# Altium PCB PCB1.PcbDoc (part 2 of 3)
Units mm, origin at the board's own origin, x right, y up, seen from the top; angles counter-clockwise.
Board outline 100 x 48 mm, 4 copper layers (Top Layer, Top GND, Bottom VM, Bottom Layer), stack 1.513 mm thick; 171 components, 136 nets, 609 pads, 571 vias.
Unrouted connection lines stored in the file: 44.
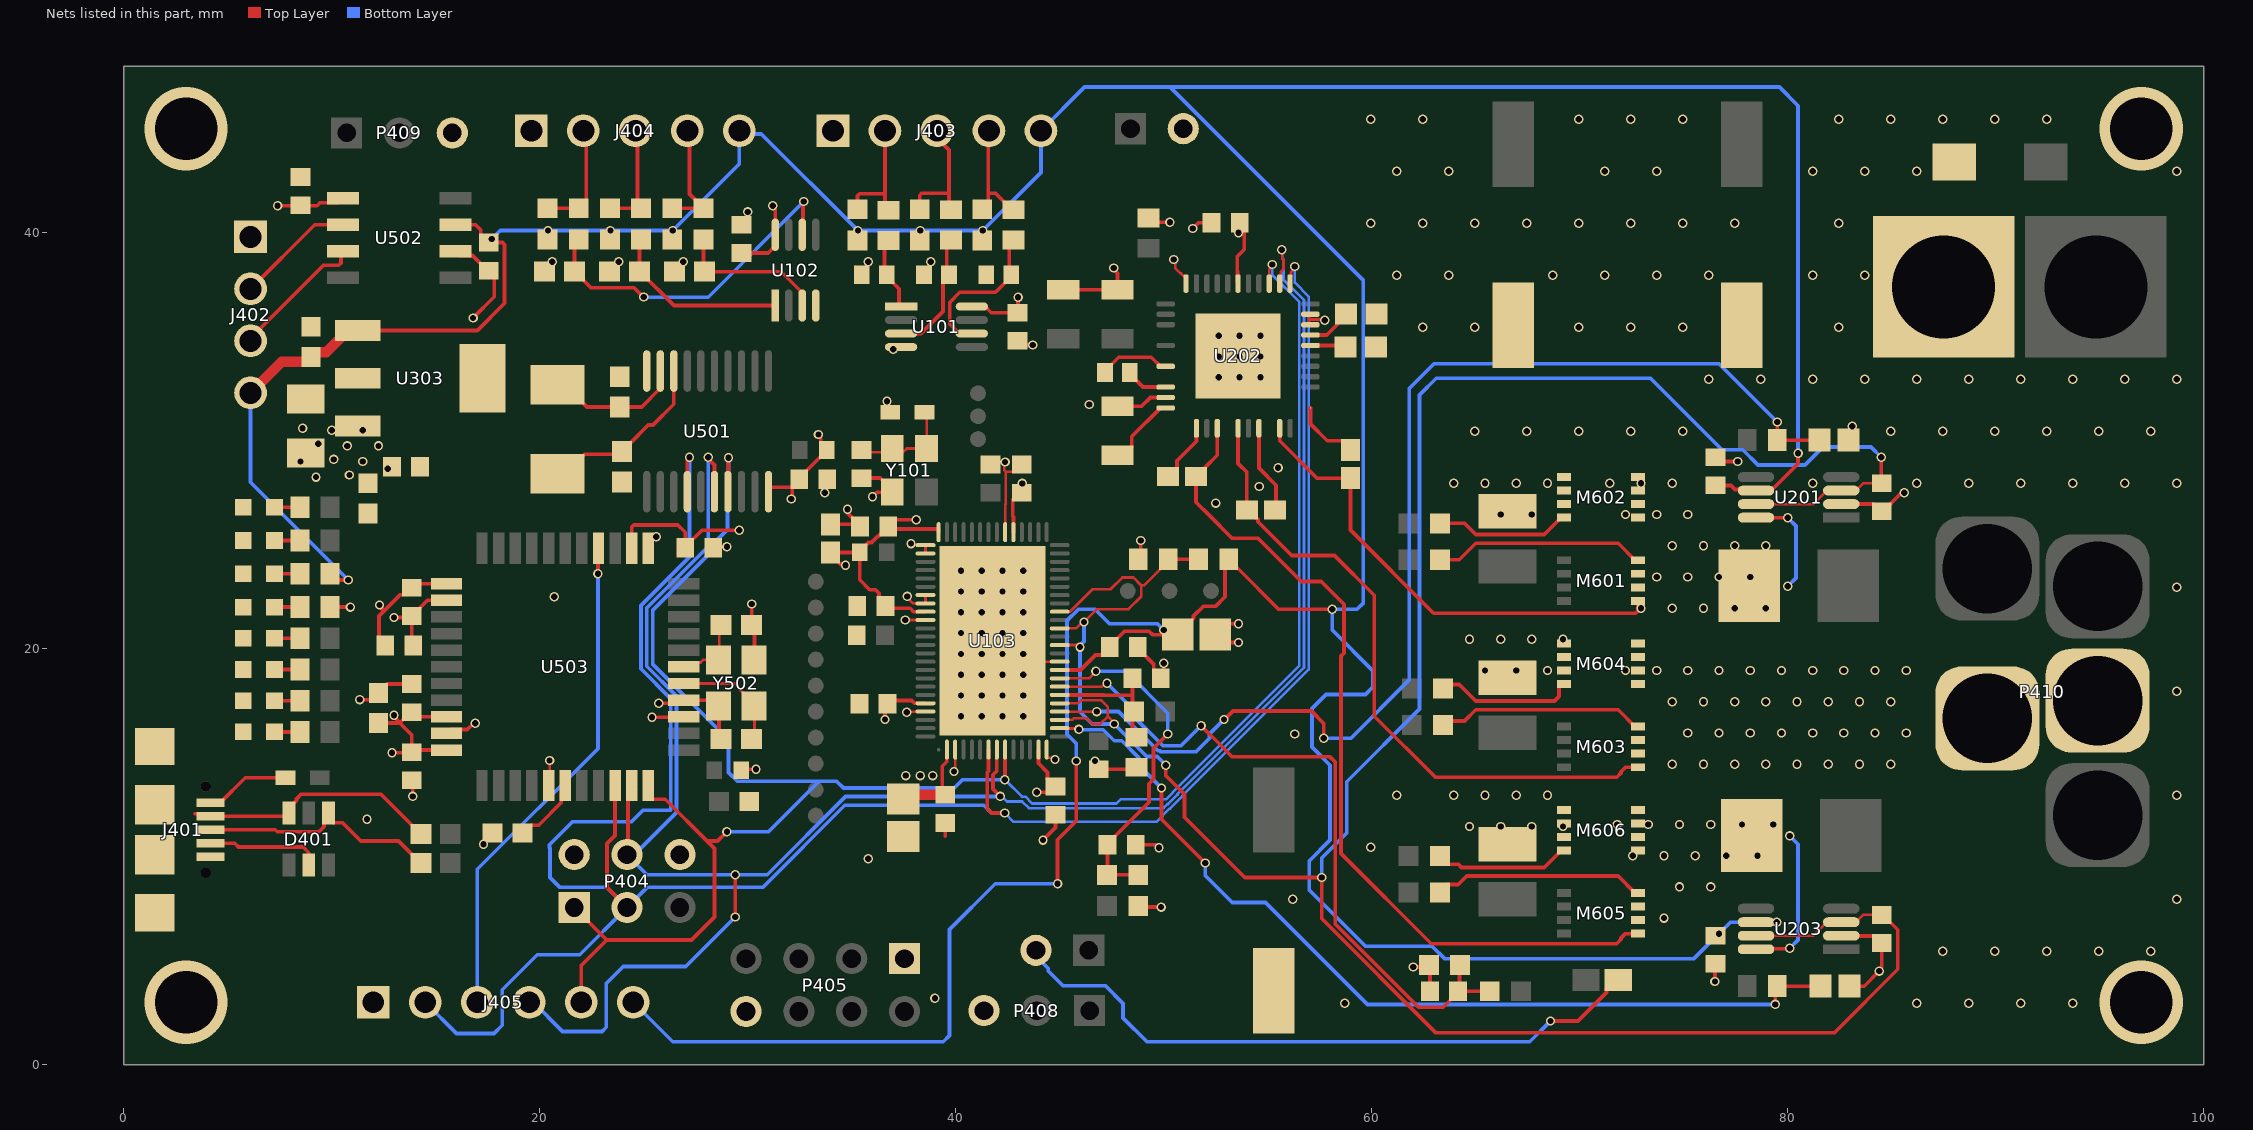
[diagram p4: the nets of this part, all layers, seen from the top]

## Part data (continued)
R101 R102 R103 R104 R105 R106 R109 R111 R112 R301 R302 R308 R309: library part CMP-1012-00586-3, "Precision Thick Film Chip Resistor, 4.7 KOhm, +/- 1%, -55 to 155 degC, 0603 (1608 Metric), RoHS, Tape and Reel", Case Code (Imperial)=1206, Case Code (Metric)=3216, Case\Package=1205, Max Operating Temperature="125 degC", Min Operating Temperature="-55 degC", Package Quantity=1, Power Rating="250 mW", Resistance="220 Ohm", Tolerance=5%, Type (Resistor)="Thick Film", Voltage Rating="50 V", ComponentLink1Description="Manufacturer URL", ComponentLink1URL=http://www.panasonic.com/, ComponentLink2Description=Datasheet, ComponentLink2URL=http://industrial.panasonic.com/cdbs/www-data/pdf/RDA0000/AOA0000C86.pdf, DatasheetVersion=Apr-15, Elements=4, Height="0.024 inch", Length="0.126 inch", Mount="Surface Mount", PackageDescription="2-Pin Surface Mount Device, Body 1.6 x 0.85 mm", PackageReference=0603, Packaging="Tape and Reel", Pins=8, Radiation Hardening=No, REACH SVHC="No SVHC", RoHSCompliant=true, Width="0.063 inch"
R107 R108 R110 R201 R202 R203 R303 R305 R306 R310 R311 R505 R506 R507 R508 R509 R510: library part CMP-2000-00180-1, Manufacturer=Panasonic, Part Number=ERJ-3EKF1001V
R113 R501 R504: library part CMP-1012-00623-3, "Chip Resistor, 10 KOhm, +/- 1%, 0.1 W, -55 to 155 degC, 0603 (1608 Metric), RoHS, Tape and Reel", Case Code (Imperial)=0603, Case Code (Metric)=1608, Manufacturer=Panasonic, Max Operating Temperature=155degC, Max Power Dissipation=100mW, Min Operating Temperature=-55degC, Package Description="2-Pin Surface Mount Device, Body 1.6 x 0.85 mm", Package Quantity=1, Package Reference=603, Resistance=10KOhm, Temperature Coefficient=100ppm\/degreesC, Tolerance=1%, Voltage Rating=75V, Case\/Package=0603, Composition=ThickFilm, Contact Plating=Tin, Datasheet URL=https://industrial.panasonic.com/cdbs/www-data/pdf/RDA0000/AOA0000C304.pdf, Datasheet Version=02/2017, Depth=0.8mm, Height=0.45mm, Lead Free=LeadFree, Length=1.6mm, Manufacturer URL=http://www.panasonic.com/, Military Standard=Not, Mount=SurfaceMount, Mounting Technology=SurfaceMount, Number of Pins=2, Number of Terminations=2, Packaging=TapeandReel, Power Rating=100mW, Radiation Hardening=No, REACH SVHC=NoSVHC, RoHSCompliant=true, Termination=SMD/SMT, Voltage Rating (DC)=75V, Width=0.031inch
R304: library part CMP-2000-00523-2, "Chip Resistor, 47 KOhm, +/- 1%, 0.1 W, -55 to 155 degC, 0603 (1608 Metric), RoHS, Tape and Reel", Case Code (Imperial)=0603, Case Code (Metric)=1608, Colour=Red, Forward Current="20 mA", Forward Voltage="2.1 V", Max Operating Temperature="100 degC", Min Operating Temperature="-40 degC", Package Quantity=3000, Power Rating="90 mW", Case\Package=0603, ComponentLink1Description="Manufacturer URL", ComponentLink1URL=http://www.panasonic.com/, ComponentLink2Description=Datasheet, ComponentLink2URL=http://industrial.panasonic.com/cdbs/www-data/pdf/RDA0000/AOA0000C86.pdf, DatasheetVersion=Apr-15, Height="0.6 mm", Illumination Colour=Red, Length="1.6 mm", Lens Style=Clear, Luminous Intensity="63 mcd", Mount="Surface Mount", Nominal Vf="2.1 V", Nominal Wavelength="639 nm", PackageDescription="2-Pin Surface Mount Device, Body 1.6 x 0.85 mm", PackageReference=0603, Packaging="Tape and Reel", Pins=2, Radiation Hardening=No, REACH SVHC="No SVHC", RoHSCompliant=true, Viewing Angle="160 degrees", Width="0.8 mm"
R307: library part CMP-2000-05271-3, "NTC Thermistor for Temperature Sensor, 0603, 10kΩ, 1%, 0.1mA, 5V", Case Code (Imperial)=0603, Case Code (Metric)=1608, Current Rating=310uA, Manufacturer Series=NCP18, Max Operating Temperature=125°C, Max Power Dissipation=100mW, Min Operating Temperature=-40°C, Package Quantity=1, Package Shape=Rectangular, Resistance=10kR, Resistance Tolerance=1%, Accuracy=0.7%, Case/Package=0603, Depth=0.8mm, Height=0.8mm, Lead Free="Lead Free", Length=1.6mm, Mount="Surface Mount", Number of Pins=2, Number of Terminals/Pins=2, Packaging="Tape and Reel", Power Rating=100mW, Radiation Hardening=No, REACH SVHC="No SVHC", RoHS Compliant=Yes, Series=NCP, Terminal Finish=Tin, Terminal Placement=Dual, Termination=SMD/SMT, Thermistor Application="TEMPERATURE COMPENSATION", Tolerance=1%
R502 R503: library part CMP-26527-001634-1, "22Ω ±5% 0.1W 0603 Thick Film Chip Resistor AEC-Q200 compliant", Case Code (Imperial)=0603, Case Code (Metric)=1608, Max Operating Temperature=155°C, Max Power Dissipation=100mW, Min Operating Temperature=-55°C, Resistor Type="Thick Film", Temperature Coefficient=100ppm/°C, Tolerance=5%, Case/Package=0603, Contact Plating=Tin, Features="Automotive AEC-Q200", Height=0.022inch, Lead Free="Lead Free", Length=0.061inch, Mount="Surface Mount", Number of Terminations=2, Packaging="Tape and Reel", Power Rating=100mW, Radiation Hardening=No, Resistance=22R, RoHS Compliant=Yes, Series=RMCF, Size Code=0603, Width=0.031inch
R601 R602 R604 R605 R606 R607: library part CMP-2000-00195-2, "RES SMD 10 OHM 1% 1/10W 0603", Manufacturer=Panasonic, Manufacturer Part Number=ERJ-3EKF10R0V, Package=ERJ3EK, Power=100mW, Power Rating=0.1W, Resistance=10Ω, Temperature="-55°C to +155°C", Temperature Coefficient=100ppm/°C, Temperature Range High=+155°C, Temperature Range Low=-55°C, Tolerance=1%, Voltage Rating=75V, Automotive=Yes, Automotive Grade="Grade 0", Category=Res, ComponentLink2Description=Datasheet, ComponentLink2URL=https://b2b-api.panasonic.eu/file_stream/pids/fileversion/1263, Composition="Thick Film", Device Class L1="Passive Components", Device Class L2=Resistors, Device Class L3="Chip SMD Resistors", Digikey Description="RES SMD 10 OHM 1% 1/10W 0603", Footprint Url=https://industrial.panasonic.com/cdbs/www-data/pdf/RDA0000/DMA0000COL17.pdf, Height=0.55mm, Ipc Land Pattern Name=RESC16080X45, Lead Free=Yes, Octopart=https://octopart.com/erj-3ekf10r0v-panasonic-55403649, RoHS=TRUE, Series=ERJ
R603 R608: library part CMP-07231-007668-1, "RES 0.003 OHM 1% 3W 2512", Case Code (Imperial)=2512, Case Code (Metric)=6432, Max Operating Temperature=170°C, Max Power Dissipation=3W, Min Operating Temperature=-55°C, Resistance=3mR, Resistance Tolerance=1%, Resistor Type="Metal Alloy", Temperature Coefficient=75ppm/°C, Case/Package=2512, Contact Plating=Tin, Depth=3.35mm, Features="Moisture Resistant", Height=0.035inch, Length=0.254inch, Mount="Surface Mount", Number of Terminations=2, Packaging="Cut Tape", Power Rating=3W, REACH SVHC="No SVHC", RoHS Compliant=No, Series=CRE2512, Technology="METAL STRIP", Termination=Solder, Tolerance=1%, Width=0.132inch
U101 U102: library part CMP-0859-00525-5, "IC BUFFER NON-INVERT 5.5V SM8", Ambient Temperature Range High=+125°C, Ambient Temperature Range Low=-40°C, Manufacturer="Texas Instruments", Max Supply Voltage=5.5V, Min Supply Voltage=1.65V, Nominal Supply Current=10uA, Package=DCT0008A, Temperature="-40°C to +125°C", Automotive=No, Category=IC, ComponentLink2Description=Datasheet, ComponentLink2URL=http://www.ti.com/lit/ds/symlink/sn74lvc3g17.pdf, Device Class L1="Integrated Circuits (ICs)", Device Class L2="Logic ICs", Device Class L3=Buffers, Digikey Description="IC BUFFER NON-INVERT 5.5V SM8", Height=1.3mm, Ipc Land Pattern Name=SOP65P400X130-8, Lead Free=Yes, Logic Function Desc=Non-Inverting, Manufacturer Part Number=SN74LVC3G17DCTR, Mouser Description="Buffers & Line Drivers TRIPLE SCHMITT- TRIGGER BUFFER", Number Of Circuits=3, Number Of Inputs=3, Number Of Outputs=3, Octopart=https://octopart.com/sn74lvc3g17dctr-texas+instruments-423176, Propagation Delay=5.1ns, RoHS=TRUE, Standoff Height=0mm, Temperature Range High=+125°C, Temperature Range Low=-40°C
U103: library part CMP-237673-000008-1, "SERVO CONTROLLER IC, QFN76", Supplier Part Number 1=3438306, Supplier 1=Farnell
U201 U203: library part CMP-09116-000026-1, "IC CURR SENSE 1 CIRCUIT 8MSOP", Input Bias Current=130uA, Input Offset Voltage=0.2mV, Manufacturer="Analog Devices", Max Supply Voltage=5.5V, Min Supply Voltage=2.7V, Nominal Supply Current=2.6mA, Package=RM-8, Temperature="-40°C to +125°C", Temperature Range High=+125°C, Temperature Range Low=-40°C, Voltage Gain=0.02V/mV, Automotive=No, Bandwidth=250kHz, Category=IC, ComponentLink2Description=Datasheet, ComponentLink2URL=https://www.analog.com/media/en/technical-documentation/data-sheets/AD8418.pdf, Device Class L1="Integrated Circuits (ICs)", Device Class L2="Linear ICs", Device Class L3=Instrumentation, Digikey Description="IC CURR SENSE 1 CIRCUIT 8MSOP", Height=1.1mm, Ipc Land Pattern Name=SOP65P490X110-8, Lead Free=Yes, Manufacturer Part Number=AD8418BRMZ, Mouser Description="Current Sense Amplifier, Bidirectional, 1, 130 A, MSOP, 8, -40 C, 125 C", Number Of Channels=1, Octopart=https://octopart.com/ad8418brmz-analog+devices-21054230, RoHS=TRUE, Standoff Height=0.05mm
U202: "No Description Available", Mfr_Name=Trinamic, RefDes=RefDes, Type=Type
U303: library part CMP-0136-00481-1, "500mA Fixed Output CMOS LDO, 3-Pin SOT-223, Extended Temperature, Tape and Reel", DatasheetVersion="revB, 2002", PackageDescription="3-Lead Plastic Small Outline Transistor (DB) [SOT-223]", PackageReference=SOT-223-DB3, PackageVersion="revBB, Aug-2009"
U501: library part CMP-0186-00077-2, "Stand-Alone CAN Controller With SPI Interface, 20-Pin TSSOP, Industrial Temperature", Code_JEDEC=MO-153-AC, ComponentLink1Description="Manufacturer URL", ComponentLink1URL=http://www.microchip.com/, ComponentLink2Description=Datasheet, ComponentLink2URL=http://ww1.microchip.com/downloads/en/DeviceDoc/21801f.pdf, ComponentLink3Description="Package Specification", ComponentLink3URL=http://www.microchip.com/stellent/groups/techpub_sg/documents/packagingspec/en012702.pdf, DatasheetVersion="revF, Oct-2010", PackageDescription="20-Lead Plastic Thin Shrink Small Outline (ST) - 4.4mm Body [TSSOP]", PackageReference=TSSOP-ST20, PackageVersion="revBB, Aug-2009", RevisionNote="URLs added. DatasheetVersion updated."
U502: library part CMP-06279-000005-1, "IC TRANSCEIVER 1/1 8SOIC", Case/Package=SOIC, Max Operating Temperature=125°C, Max Supply Voltage=5.5V, Min Operating Temperature=-40°C, Min Supply Voltage=4.5V, Operating Supply Current=70mA, Package Quantity=3300, Data Rate=8Mbps, Mount="Surface Mount", Number of Pins=8, Number of Transceivers=1, Packaging="Tape and Reel", Receiver Hysteresis=200mV, Weight=0.019048oz
U503: library part CMP-06276-000452-1, "IC MCU 8BIT 32KB FLASH 44TQFP", Case/Package=TQFP, Frequency=16MHz, Max Operating Temperature=85°C, Max Supply Voltage=5.5V, Min Operating Temperature=-40°C, Min Supply Voltage=2.7V, Package Quantity=1500, Core Architecture=AVR, Data Bus Width=8b, Interface=I2C, Max Frequency=16MHz, Memory Size=32KB, Memory Type=FLASH, Mount="Surface Mount", Number of I/Os=26, Number of Pins=44, Number of Timers/Counters=4, Oscillator Type=Internal, Packaging="Tape and Reel", Peripherals="Brown-out Detect/Reset", RAM Size=2.5KB, Series="AVR® ATmega"
Y101: library part CMP-27762-000357-1, "XTAL Oscillator 25MHz ±25ppm CMOS 3.3V 4-SMD 3.2mm x 2.5mm", Case/Package=SMD/SMT, Frequency=25MHz, Frequency Stability=25ppm, Load Capacitance=15pF, Max Operating Temperature=85°C, Max Supply Current=13mA, Max Supply Voltage=3.465V, Min Operating Temperature=-40°C, Min Supply Voltage=3.135V, Operating Frequency="25 MHz", Operating Supply Voltage=3.3V, Package Quantity=1000, Height=0.047inch, Lead Free="Lead Free", Length=0.126inch, Mount="Surface Mount", Number of Pins=4, Packaging="Tape and Reel", REACH SVHC="No SVHC", Series=ASE, Termination=SMD/SMT, Width=0.098inch
Y501: library part CMP-2000-05034-2, "Crystal 8MHz ±20ppm 18pF SMD-2 6mm x 3.5mm", Case/Package=CSMD, ESR (Equivalent Series Resistance)=100R, Frequency Stability=30ppm, Frequency Tolerance=20ppm, Load Capacitance=18pF, Max Operating Temperature=85°C, Min Operating Temperature=-40°C, Operating Frequency="8 MHz", Package Quantity=1000, Resistor Type=Ceramic, Series Resistance=80R, Depth=3.5mm, Frequency=8MHz, Height=0.055inch, Lead Free="Lead Free", Length=6mm, Mount="Surface Mount", Number of Pins=2, Packaging="Tape and Reel", Radiation Hardening=No, REACH SVHC=Yes, Series=ABM7, Termination=SMD/SMT, Tolerance=20ppm, Width=0.138inch
Y502: library part CMP-27762-006537-2, "Crystal 16MHz ±20ppm (Tol) ±30ppm (Stability) 18pF FUND 80Ω 4-Pin SMD T/R", Case/Package=CSMD, ESR (Equivalent Series Resistance)=80R, Frequency Stability=30ppm, Frequency Tolerance=20ppm, Load Capacitance=18pF, Max Operating Temperature=85°C, Min Operating Temperature=-40°C, Operating Frequency="16 MHz", Package Quantity=1000, Depth=2.5mm, Frequency=16MHz, Height=1mm, Lead Free="Lead Free", Length=3.2mm, Mount="Surface Mount", Number of Pins=4, Packaging="Tape and Reel", Radiation Hardening=No, Series=ABM8G, Series Resistance=80R, Termination=SMD/SMT, Tolerance=20ppm, Width=2.5mm

## Via types
v1: diameter 0.45, hole 0.3, Top Layer to Bottom Layer, tented both sides, 488 vias
v2: diameter 0.45, hole 0.3, Top Layer to Bottom Layer, 77 vias
v3: diameter 4, hole 3, Top Layer to Bottom Layer, 4 vias
v4: diameter 0.8, hole 0.5, Top Layer to Bottom Layer, tented both sides, 2 vias

## Nets (pads, with @x,y where several pads share a name; then routed paths per layer and width w, separated by ;. In a path a pad name is that pad's centre, name@x,y a point inside that pad or via, vN(x,y) a via of type N, cw(c..) or ccw(c..) an arc to the next point about the centre after c; other vN are vias at no path point)
+2.5VREF: C201.1 C207.1 R310.1 R311.2 U103.17 U103.19 U103.26 U103.28 U103.30 U201.3 U201.7 U203.3 U203.7 | length 140.9
  Top Layer w0.127: U103.17@45.003,16.577 45.612,16.577 45.698,16.664 46.29,16.664 46.577,16.377 46.944,16.377 47.32,16.752 ; U103.19@45.003,17.377 45.888,17.377 46.03,17.52 47.002,17.52 47.32,17.202 47.32,16.752 ; U103.26@45.003,20.177 45.791,20.177 45.89,20.078 v1(45.977,20.078) ; U103.28@45.003,20.977 45.775,20.977 46.021,21.222 46.125,21.222 46.17,21.177 v1(46.17,21.284) 46.784,21.898 48.309,21.898 48.922,22.51 48.922,23.044 ; U103.30@45.003,21.777 45.015,21.79 45.508,21.79 46.577,22.858 47.447,22.858 48.01,23.421 48.544,23.421 48.922,23.044 ; v1(47.623,16.383) 47.623,16.449 47.32,16.752 ; R311.2@50.225,24.225 49.044,23.044 48.922,23.044 ; U203.7@78.477,6.202 81.229,6.202 81.879,6.852 U203.3@82.577,6.852 83.276,6.852 83.626,7.202 C207.1@84.527,7.202 ; U201.7@78.477,26.952 81.229,26.952 81.879,27.602 U201.3@82.577,27.602 83.276,27.602 83.626,27.952 C201.1@84.527,27.952
  Top Layer w0.18: v1(50.1,14.4) 50.1,13.905 51,13.005 51,11.9 53.9,9 v1(57.6,9) 57.6,7.023 63.092,1.531 82.236,1.531 85.292,4.587 85.292,6.487 84.577,7.202 C207.1@84.527,7.202 ; R311.2@50.225,24.225 50.3,24.3 R310.1@51.675,24.3 ; v1(84.5,29.2) 84.5,27.979 C201.1@84.527,27.952
  Bottom Layer w0.18: v1(46.17,21.284) 46.17,20.344 45.977,20.151 v1(45.977,20.078) 45.977,16.972 46.566,16.383 v1(47.623,16.383) 49.186,14.82 49.683,14.82 49.747,14.756 49.756,14.756 50.1,14.413 v1(50.1,14.4) ; v1(57.6,9) 57.6,9.943 58.8,11.143 58.8,13.6 62.3,17.1 62.3,32.2 63.1,33 73.404,33 76.835,29.569 77.836,29.569 78.574,28.831 80.825,28.831 81.694,29.7 84,29.7 v1(84.5,29.2)
+3.3: C108.1 C109.1 C307.2 C308.2 C309.2 C310.2 C311.2 C312.2 C313.2 C314.2 C315.2 C327.1 C329.2 C330.2 C506.1 C507.2 C508.2 C511.1 C512.2 C513.2 C514.2 C515.2 FB101.1 P403.2 P404.2 P405.1 R113.2 R201.2 R306.2 R307.2 R501.2 R504.2 U101.8 U102.8 U103.2 U103.13 U103.43 U103.52 U103.61 U103.72 U202.16 U303.3 U501.20 U502.5 U503.14 U503.24 U503.34 U503.42 U503.44 | length 104.5
  Top Layer w0.18: v1(7.4,41.3) 9.303,41.3 9.447,41.445 10.34,41.445 U502.5@10.55,41.655 ; C329.2@8.75,29.4 C329.2@8.75,29.75 ; R306.2@10,22 v1(10.9,22) ; U303.3@11.497,30.5 U303.3@11.5,30.503 ; C511.1@12.25,16.423 13.273,16.423 ; v1(12.3,22.1) 12.3,22.027 12.511,21.816 ; C506.1@12.575,20.15 12.273,20.452 12.273,21.578 13.211,22.515 13.285,22.59 13.465,22.59 14.002,23.127 U503.34@15.527,23.127 ; v1(12.7,28.65) 12.8,28.75 C330.2@12.9,28.75 ; v1(12.9,15) 13.825,15 C514.2@13.85,15.025 ; v1(13,16.8) 13,16.727 13.273,16.454 13.273,16.423 ; U503.44@15.527,15.127 13.952,15.127 C514.2@13.85,15.025 ; U503.42@15.527,16.727 14.073,16.727 C513.2@13.85,16.95 13.8,16.95 13.273,16.423 ; U503.24@24.427,24.827 24.427,25.847 24.532,25.952 26.643,25.952 27,25.595 C515.2@27,24.9 ; v1(25.4,16.7) 26.9,16.7 U503.14@26.927,16.727 ; C515.2@27,24.85 C515.2@27,24.9 ; v1(29.6,25.7) 27.8,25.7 C515.2@27,24.9 ; R504.2@29.7,14.15 29.75,14.2 v1(30.4,14.2) ; C109.1@29.7,39.025 30.986,39.025 31.325,39.364 U102.8@31.325,39.9 31.325,41.102 31.2,41.227 v1(31.2,41.3) ; U501.20@31,27.765 C507.2@32.14,27.765 ; v1(32.1,27.2) 32.14,27.24 C507.2@32.14,27.765 ; v1(33.4,30.3) 33.4,30.227 33.515,30.112 33.515,29.835 R501.2@33.8,29.55 33.8,29.5 33.515,29.215 33.49,29.215 32.475,28.2 C507.2@32.475,28.15 32.14,27.815 C507.2@32.14,27.765 ; v1(34.7,24.011) 34.659,24.052 34.48,24.052 33.977,24.554 C315.2@33.977,24.627 35.327,24.627 35.812,25.112 35.952,25.112 36.239,25.4 36.275,25.4 36.367,25.492 36.417,25.492 C311.2@36.675,25.75 ; R113.2@35.385,24.635 35.385,23.315 35.863,22.837 36.141,22.837 36.315,22.662 36.315,22.36 36.729,21.946 37.813,21.946 37.979,21.779 38.549,21.779 U103.61@38.551,21.777 ; v1(36.6,16.6) 36.6,17.225 C308.2@36.725,17.35 36.891,17.516 37.882,17.516 38.007,17.391 38.019,17.379 38.549,17.379 U103.72@38.551,17.377 ; v1(36.7,31.9) 36.7,31.529 FB101.1@36.852,31.377 ; v1(38.1,26.2) 37.075,26.2 C311.2@36.752,25.877 36.752,25.827 C311.2@36.675,25.75 ; U103.52@39.177,25.602 39.177,25.744 39.171,25.75 C311.2@36.675,25.75 ; C309.2@39.5,12.975 39.353,13.122 39.353,14.347 39.575,14.568 39.575,15.149 U103.2@39.577,15.151 ; U101.8@40.777,36.452 41.414,36.452 41.714,36.152 C108.1@42.977,36.152 43,36.175 v1(43,36.9) ; U103.43@42.777,25.602 42.777,26.329 42.743,26.362 42.743,27.168 C312.2@43.077,27.502 ; C312.2@43.177,27.502 43.177,27.925 v1(43.2,27.948) ; v1(43.9,13.1) 44.525,13.1 C307.2@44.8,13.375 44.75,13.375 44.415,13.71 44.415,14.055 43.979,14.491 43.979,15.149 U103.13@43.977,15.151 ; R201.2@49.277,40.702 49.479,40.5 v1(50.3,40.5) ; U202.16@53.577,37.557 53.543,37.591 53.543,38.133 53.535,38.141 53.535,38.856 53.877,39.199 53.877,40.252 C314.2@53.652,40.477 53.652,40.052 v1(53.6,40) ; v1(68.6,2.1) 69.916,2.1 71.29,3.474 71.29,3.638 71.729,4.077 R307.2@71.853,4.077 ; 13.273,16.423 13.85,15.846 C514.2@13.85,15.025
  Top Layer w0.5: C313.2@37.477,12.777 37.675,12.975 C309.2@39.5,12.975
  Bottom Layer w0.18: P403.2@43.86,5.5 43.86,5.227 44.445,4.642 44.445,4.515 45.16,3.8 47.2,3.8 48.05,2.95 48.05,2.25 49.2,1.1 67.6,1.1 v1(68.6,2.1)
  other v1: 37.6,13.9 38.3,13.9 38.9,13.9 9.25,28.25 10.852,28.352 8.5,29 11.5,29 10.1,29.1 10.75,29.75 12.25,29.75 9.352,29.852 10,30.5 11.5,30.5 8.602,30.602
+5: C211.1 C212.1 C304.2 C305.2 C321.1 C509.2 J402.4 J403.5 J404.5 J405.6 R101.2 R102.2 R103.2 R104.2 R105.2 R106.2 R305.2 R310.2 U103.23 U201.6 U203.6 U303.1 U502.3 | length 264.5
  Top Layer w0.18: R305.2@9.8,23.6 10.1,23.3 v1(10.8,23.3) ; R305.2@9.925,23.6 R305.2@9.925,23.675 ; U303.1@11.25,35.3 17.005,35.3 18.315,36.61 18.315,39.42 18.21,39.525 17.5,39.525 17.165,39.86 17.165,40.13 16.91,40.385 U502.3@15.95,40.385 ; R102.2@20.377,39.677 20.377,40.077 v1(20.4,40.1) ; R106.2@23.377,39.677 23.377,40.077 v1(23.4,40.1) ; R104.2@26.377,39.677 26.377,40.077 v1(26.4,40.1) ; R105.2@35.277,39.627 35.277,40.077 v1(35.3,40.1) ; R103.2@38.277,39.627 38.277,40.077 v1(38.3,40.1) ; R101.2@41.277,39.627 41.277,40.077 v1(41.3,40.1) ; v1(44.9,8.7) 44.9,10.815 45.8,11.715 v1(45.8,14.6) ; U103.23@45.003,18.977 46.001,18.977 46.716,19.692 47.067,19.692 47.402,20.027 47.402,20.127 48.117,20.842 49.297,20.842 49.462,20.677 C304.2@50.677,20.677 50.677,20.702 51.437,21.462 51.437,21.572 51.9,22.036 52.485,22.036 52.948,22.499 52.948,24.123 R310.2@53.125,24.3 53.125,24.225 53.485,23.865 53.56,23.865 55.525,21.9 v1(58.1,21.9) ; C211.1@76.527,27.852 77.272,27.852 77.465,27.659 78.42,27.659 U201.6@78.477,27.602 79.196,27.602 79.318,27.724 79.334,27.724 80.5,28.89 v1(80.5,29.4)
  Top Layer w0.5: J402.4@6.1,32.3 7.594,33.794 8.794,33.794 9,34 9,34.046 9.206,34.252 9.743,34.252 10.4,34.909 10.4,35.05 10.65,35.3 U303.1@11.25,35.3
  Bottom Layer w0.18: J402.4@6.1,32.3 6.1,28 v1(10.8,23.3) ; v1(17.7,39.7) 17.703,39.7 18.103,40.1 v1(23.4,40.1) v1(26.4,40.1) 29.6,43.3 J404.5@29.6,44.9 29.757,44.743 30.658,44.743 v1(35.3,40.1) v1(38.3,40.1) v1(41.3,40.1) 44.1,42.9 J403.5@44.1,44.9 46.2,47 50.308,47 ; J405.6@24.5,3 26.4,1.1 39.4,1.1 39.7,1.4 39.7,6.5 41.9,8.7 v1(44.9,8.7) ; v1(45.8,14.6) 45.8,15.439 45.354,15.885 45.354,21.354 45.9,21.9 46.7,21.9 47.4,21.2 49.7,21.2 v1(50,20.9) ; v1(79.48,6.852) 77.252,6.852 v1(76.7,6.3) 75.5,5.1 63.5,5.1 62.9,5.7 59.7,5.7 56.998,8.402 56.998,9.798 58,10.8 58,14.4 57.131,15.269 57.131,17.131 57.8,17.8 59.697,17.8 60.069,18.172 60.069,18.931 58.1,20.9 v1(58.1,21.9) 59.3,21.9 59.6,22.2 59.6,37.708 50.308,47 ; v1(80.5,29.4) 80.5,46.1 79.6,47 50.308,47
GND: *401.2 C101.2 C102.2 C103.2 C104.2 C105.2 C106.2 C107.2 C108.2 C109.2 C201.2 C202.1 C207.2 C208.2 C209.2 C210.1 C211.2 C212.2 C301.1 C302.1 C303.1 C304.1 C305.1 C307.1 C308.1 C309.1 C310.1 C311.1 C312.1 C313.1 C314.1 C315.1 C316.2 C317.1 C318.2 C319.1 C320.1 C321.2 C322.1 C323.1 C324.1 C327.2 C329.1 C330.1 C501.1 C502.2 C503.2 C504.2 C505.1 C506.2 C507.1 C508.1 C509.1 C510.2 C511.2 C512.1 C513.1 C514.1 C515.1 C601.2 C602.2 C603.2 D301.1 D302.1 D401.2 D402.1 D501.1 D502.1 DS501.2 DS502.2 DS503.2 DS504.2 J401.4 J401.5 J401.Shell J402.1 J403.1 J404.1 J405.1 M602.1 M602.2 M602.3 M604.1 M604.2 M604.3 M606.1 M606.2 M606.3 P404.6 P405.8 P406.2 P408.3 P409.3 R301.1 R303.1 R309.1 R311.1 U101.4 U102.4 U103.3 U103.14 U103.24 U103.44 U103.53 U103.54 U103.59 U103.60 U103.62 U103.73 U103.77 U201.2 U202.8 U202.9 U202.21 U202.38 U203.2 U303.2 U303.4 U501.10 U502.2 U503.5 U503.15 U503.23 U503.35 U503.43 Y101.2 Y502.2 Y502.4 | length 89.4
  Top Layer w0.127: U503.5@20.427,13.427 20.477,13.477 v1(20.477,14.627) ; v1(37.577,21.377) U103.62@38.551,21.377 ; v1(37.677,22.515) 37.677,22.441 37.941,22.177 U103.60@38.551,22.177 U103.59@38.551,22.577 ; v1@37.677,16.964 38.539,16.964 U103.73@38.551,16.977 ; v1(37.851,25.054) 37.939,25.054 38.003,24.99 38.16,24.99 38.172,24.977 U103.53@38.551,24.977 U103.54@38.551,24.577 ; v1(39.922,14.1) 39.977,14.155 U103.3@39.977,15.151 ; U103.77@41.777,20.377 42.777,19.377 U103.24@45.003,19.377 ; U103.44@42.377,25.602 42.377,26.929 42.416,26.968 42.416,28.503 ; v1(42.377,28.977) 42.341,28.941 42.341,28.577 42.416,28.503 ; C312.1@43.177,28.852 42.828,28.503 42.416,28.503 ; U103.14@44.377,15.151 44.377,14.785 44.407,14.755 44.612,14.755 44.69,14.677 v1(44.777,14.677) ; v1(50.487,38.713) 50.549,38.651 50.549,38.3 50.811,38.038 50.837,38.038 51.077,37.798 U202.21@51.077,37.557 ; U202.8@57.057,35.577 57.054,35.577 56.993,35.638 56.993,35.827 ; U202.9@57.057,36.077 57.054,36.077 56.993,36.016 56.993,35.827 ; v1(57.745,35.79) 57.707,35.827 56.993,35.827
  Top Layer w0.18: J401.4@4.175,10.65 5.341,10.65 5.526,10.464 8.63,10.464 8.9,10.195 D401.2@8.9,9.6 ; v1(11.348,17.552) 11.884,17.552 11.884,17.5 12.25,17.866 12.25,17.9 12.65,18.3 C513.1@13.85,18.3 ; v1(13,21.5) 13.775,21.5 C512.1@13.85,21.575 ; C514.1@13.85,13.675 13.9,13.625 v1(13.9,12.9) ; C506.2@13.925,20.15 13.85,20.225 C512.1@13.85,21.575 ; U503.43@15.527,15.927 15.712,16.112 16.52,16.112 16.827,16.419 v1(16.9,16.419) ; U503.35@15.527,22.327 14.602,22.327 14.235,21.96 14.235,21.91 13.9,21.575 C512.1@13.85,21.575 ; U502.2@15.95,39.115 16.16,38.905 16.77,38.905 17.5,38.175 C509.1@17.55,38.175 ; v1(16.8,35.9) 17.819,36.919 17.819,38.029 C509.1@17.611,38.236 ; v1(17.3,10.6) 17.334,10.634 17.334,10.784 17.7,11.15 C505.1@17.723,11.15 ; C102.2@20.225,38.127 20.225,38.225 v1(20.6,38.6) ; C107.2@23.351,38.127 23.351,38.151 v1(23.8,38.6) ; U503.23@25.227,24.827 25.227,25.198 25.412,25.383 v1(25.606,25.383) ; v1(25.727,17.377) 26.777,17.377 U503.15@26.927,17.527 28.323,17.527 28.627,17.223 28.627,15.747 C504.2@28.724,15.65 ; C105.2@26.477,38.127 26.477,38.177 v1(26.9,38.6) ; C515.1@28.35,24.85 28.4,24.9 v1(29,24.9) ; C109.2@29.7,40.375 30,40.675 v1(30,41) ; v1(30.2,22.15) 30.2,21.174 C503.2@30.176,21.15 30.327,20.999 30.327,19.477 Y502.4@30.3,19.45 ; v1(33.7,27.5) 33.7,28.025 C507.1@33.825,28.15 ; C315.1@33.977,25.981 35.298,25.981 C311.1@35.402,25.877 35.402,25.927 34.852,26.477 34.852,26.648 v1(34.8,26.7) ; C106.2@35.192,38.337 35.477,38.052 C106.2@35.477,37.977 ; C103.2@35.477,28.202 36.377,28.202 36.952,27.627 Y101.2@36.952,27.527 36.23,27.527 36.003,27.3 v1(36,27.3) ; 39.5,11 C309.1@39.5,11.625 ; C108.2@42.977,34.802 43.179,34.6 v1(43.7,34.6) ; v1(44.2,10.8) 44.8,11.4 C307.1@44.8,12.025 ; C316.2@45.177,37.252 C318.2@47.777,37.252 47.777,38.05 47.6,38.227 v1(47.6,38.3) ; v1(46.7,14.6) 46.7,14.379 C303.1@46.877,14.202 48.602,14.202 R303.1@48.7,14.3 ; C317.1@48.652,10.577 49.604,10.577 49.746,10.434 v1(49.777,10.434) ; C305.1@48.752,20.077 48.752,20.027 49.517,19.262 49.517,18.912 C319.1@49.852,18.577 50,18.725 v1(50,19.3) ; R311.1@48.775,24.3 48.9,24.425 v1(48.9,25.2) ; R301.1@48.777,7.627 48.827,7.577 v1(49.877,7.577) ; v1(51.4,40.2) 51.677,40.477 C314.1@52.302,40.477 ; v1(53.6,20.3) 52.854,20.3 C304.1@52.477,20.677 53,21.2 v1(53.6,21.2) ; v1(62,4.7) 62.65,4.7 R309.1@62.75,4.8 62.802,4.748 C320.1@62.802,3.527 ; v1(76.5,4) 76.5,4.825 C212.2@76.527,4.852 ; C211.2@76.527,29.202 76.729,29 v1(77.6,29) ; U203.2@82.577,6.202 82.592,6.187 84.192,6.187 C207.2@84.527,5.852 84.527,4.7 84.4,4.573 v1(84.4,4.5) 83.677,3.777 C210.1@82.977,3.777 ; U201.2@82.577,26.952 84.127,26.952 84.477,26.602 C201.2@84.527,26.602 84.577,26.602 85.423,27.448 85.548,27.448 v1(85.6,27.5) ; C202.1@82.927,30.027 83.1,30.2 v1(83.1,30.7)
  other v1: 58.7,2.95 86.2,2.95 88.7,2.95 91.2,2.95 93.7,2.95 39,3.2 87.45,5.45 89.95,5.45 92.45,5.45 94.95,5.45 97.45,5.45 56.2,7.95 98.7,7.95 35.8,9.9 59.95,10.45 64.7,11.45 66.2,11.45 67.7,11.45 69.2,11.45 11.7,11.8 61.2,12.95 63.95,12.95 65.45,12.95 66.95,12.95 68.45,12.95 98.7,12.95 56.3,15.9 37.647,16.947 98.7,17.95 65.45,18.95 66.95,18.95 68.45,18.95 64.7,20.45 66.2,20.45 67.7,20.45 69.2,20.45 20.7,22.5 98.7,22.95 66.2,26.45 67.7,26.45 52.5,27 54.6,27.8 63.95,27.95 65.45,27.95 66.95,27.95 68.45,27.95 81.2,27.95 86.2,27.95 88.7,27.95 91.2,27.95 93.7,27.95 96.2,27.95 98.7,27.95 55.5,28.7 64.95,30.45 67.45,30.45 69.95,30.45 72.45,30.45 74.95,30.45 84.95,30.45 87.45,30.45 89.95,30.45 92.45,30.45 94.95,30.45 97.45,30.45 46.419,31.741 76.2,32.95 78.7,32.95 81.2,32.95 83.7,32.95 86.2,32.95 88.7,32.95 91.2,32.95 93.7,32.95 96.2,32.95 98.7,32.95 37,34.4 62.45,35.45 64.95,35.45 69.95,35.45 72.45,35.45 74.95,35.45 82.45,35.45 61.2,37.95 63.7,37.95 68.7,37.95 71.2,37.95 73.7,37.95 76.2,37.95 81.2,37.95 83.7,37.95 35.8,38.6 38.8,38.6 59.95,40.45 62.45,40.45 64.95,40.45 67.45,40.45 69.95,40.45 72.45,40.45 74.95,40.45 77.45,40.45 82.45,40.45 61.2,42.95 63.7,42.95 71.2,42.95 73.7,42.95 81.2,42.95 83.7,42.95 86.2,42.95 98.7,42.95 59.95,45.45 62.45,45.45 69.95,45.45 72.45,45.45 74.95,45.45 82.45,45.45 84.95,45.45 87.45,45.45 89.95,45.45 92.45,45.45
  other v2: 40.25,16.75 41.25,16.75 42.25,16.75 43.25,16.75 40.25,17.75 41.25,17.75 42.25,17.75 43.25,17.75 40.25,18.75 41.25,18.75 42.25,18.75 43.25,18.75 40.25,19.75 41.25,19.75 42.25,19.75 43.25,19.75 40.25,20.75 41.25,20.75 42.25,20.75 43.25,20.75 40.25,21.75 41.25,21.75 42.25,21.75 43.25,21.75 40.25,22.75 41.25,22.75 42.25,22.75 43.25,22.75 40.25,23.75 41.25,23.75 42.25,23.75 43.25,23.75 52.65,33.05 53.65,33.05 54.65,33.05 52.65,34.05 53.65,34.05 54.65,34.05 52.65,35.05 53.65,35.05 54.65,35.05
  other v3: 3,3 97,3 3,45 97,45
NetC101_1: C101.1 R107.2 U101.6 | length 7.7
  Top Layer w0.18: U101.6@40.777,35.152 40.162,35.152 39.71,35.604 39.71,36.65 40.194,37.133 41.909,37.133 42.677,37.902 C101.1@42.677,37.977 42.577,38.077 42.577,39.452 R107.2@42.777,39.652
NetC102_1: C102.1 R109.1 U102.6 | length 17.3
  Top Layer w0.18: R109.1@21.877,39.677 21.677,39.477 C102.1@21.677,38.127 21.701,38.127 22.47,37.358 24.542,37.358 24.994,36.906 v1(25.004,36.906) ; U102.6@32.625,39.285 U102.6@32.625,39.9 32.662,39.938 32.662,41.462 v1(32.7,41.5)
  Bottom Layer w0.18: v1(25.004,36.906) 25.01,36.9 28.1,36.9 v1(32.7,41.5)
NetC103_1: C103.1 FB101.2 Y101.1 Y101.4 | length 5
  Top Layer w0.127: C103.1@35.477,29.552 35.577,29.452 37.477,29.452 37.652,29.627 Y101.4@38.602,29.627 38.602,31.277 FB101.2@38.502,31.377
NetC104_1: C104.1 R108.2 U101.3 | length 6.1
  Top Layer w0.18: U101.3@37.377,35.152 38.338,35.152 39.392,36.206 39.392,37.692 39.627,37.927 C104.1@39.677,37.977 39.577,38.077 39.577,39.452 R108.2@39.777,39.652
NetC105_1: C105.1 R111.1 U102.3 | length 7.3
  Top Layer w0.18: R111.1@27.877,39.677 27.877,38.179 C105.1@27.929,38.127 31.613,38.127 32.625,37.115 U102.3@32.625,36.5
NetC106_1: C106.1 R110.2 U101.1 | length 3.9
  Top Layer w0.18: U101.1@37.377,36.452 37.279,36.55 37.277,36.55 37.277,37.302 36.677,37.902 C106.1@36.677,37.977 36.577,38.077 R110.2@36.577,39.427 ; R110.2@36.577,39.427 R110.2@36.777,39.627 R110.2@36.577,39.427
NetC107_1: C107.1 R112.1 U102.1 | length 8.8
  Top Layer w0.18: R112.1@24.877,39.677 24.803,39.603 C107.1@24.803,38.127 24.827,38.127 26.454,36.5 U102.1@31.325,36.5
NetC202_2: C202.2 R202.2 U103.18 | length 56.9
  Top Layer w0.127: U103.18@45.003,16.977 v1(46.777,16.977)
  Top Layer w0.18: v1(52.9,16.6) 52.927,16.6 53.327,17 57.1,17 57.7,16.4 v1(57.7,15.7) ; v1(79.5,30.9) 79.5,30.029 R202.2@79.502,30.027 C202.2@81.527,30.027
  Bottom Layer w0.18: v1(46.777,16.977) 47.834,16.977 49.711,15.1 49.799,15.1 49.848,15.051 51.551,15.051 52.2,15.7 52.2,15.895 52.9,16.595 v1(52.9,16.6) ; v1(57.7,15.7) 59.005,15.7 61.8,18.495 61.8,32.5 63,33.7 76.7,33.7 v1(79.5,30.9)
NetC203_1: C203.1 U202.1 | length 3.3
  Top Layer w0.18: U202.1@57.057,31.577 57.057,30.797 57.861,29.993 58.611,29.993 58.977,29.627 C203.1@58.977,29.554
NetC203_2: C203.2 M601.1 M601.2 M601.3 M602.5 M602.6 M602.7 M602.8 R603.1 U201.8 U202.36 | length 28.4
  Top Layer w0.18: U202.36@55.577,30.597 55.577,29.993 57.37,28.2 C203.2@58.977,28.2 58.977,25.706 62.978,21.705 72.7,21.705 72.805,21.81 M601.1@72.805,22.302 ; U201.8@78.477,26.302 78.478,26.301 79.999,26.301 v1(80,26.3)
  Bottom Layer w0.18: v1(80,23) 80.4,23.4 80.4,25.9 v1(80,26.3)
  other v1: 72.95,21.95 74.45,21.95 75.95,21.95 77.45,21.95 78.95,21.95 73.7,23.45 75.2,23.45 76.7,23.45 78.2,23.45 74.45,24.95 75.95,24.95 77.45,24.95 78.95,24.95 72.2,26.45 73.7,26.45 75.2,26.45 71.45,27.95 72.95,27.95 74.45,27.95
NetC204_1: C204.1 U202.27 | length 2.1
  Top Layer w0.18: C204.1@48.377,33.277 48.377,33.202 49.002,32.577 U202.27@50.097,32.577
NetC204_2: C204.2 U202.26 | length 3.5
  Top Layer w0.18: C204.2@47.177,33.277 47.177,33.352 47.842,34.017 49.403,34.017 49.843,33.577 U202.26@50.097,33.577
NetC205_1: C205.1 U202.35 | length 4.3
  Top Layer w0.18: U202.35@54.577,30.597 54.577,28.683 55.4,27.86 C205.1@55.4,26.7 ; C205.1@55.354,26.677 C205.1@55.354,26.7
NetC205_2: C205.2 M603.1 M603.2 M603.3 M604.5 M604.6 M604.7 M604.8 P410.2 U202.33 | length 31.9
  Top Layer w0.18: U202.33@53.577,30.597 53.577,28.903 54,28.48 C205.2@54,26.677 54.073,26.677 54.535,26.214 54.535,26.101 56.156,24.48 58.216,24.48 60.128,22.568 60.128,16.756 63.068,13.815 71.777,13.815 71.991,14.029 71.991,14.088 72.205,14.302 M603.1@72.805,14.302
  other v1: 74.45,14.45 75.95,14.45 77.45,14.45 78.95,14.45 80.45,14.45 81.95,14.45 83.45,14.45 84.95,14.45 75.2,15.95 76.7,15.95 78.2,15.95 79.7,15.95 81.2,15.95 82.7,15.95 84.2,15.95 85.7,15.95 74.45,17.45 75.95,17.45 77.45,17.45 78.95,17.45 80.45,17.45 81.95,17.45 83.45,17.45 84.95,17.45 72.2,18.95 73.7,18.95 75.2,18.95 76.7,18.95 78.2,18.95 79.7,18.95 81.2,18.95 82.7,18.95 84.2,18.95 85.7,18.95
NetC206_1: C206.1 U202.30 | length 2.9
  Top Layer w0.18: C206.1@50.2,28.277 50.273,28.277 50.639,28.643 50.639,29.039 51.577,29.977 U202.30@51.577,30.597
NetC206_2: C206.2 M605.1 M605.2 M605.3 M606.5 M606.6 M606.7 M606.8 R608.1 U202.32 U203.8 | length 49.3
  Top Layer w0.18: C206.2@51.554,28.277 51.554,27.046 52.2,26.4 53.288,25.312 54.532,25.312 56.617,23.227 57.578,23.227 58.669,22.136 58.669,19.786 58.528,19.645 58.528,10.156 62.868,5.815 71.777,5.815 71.991,6.029 71.991,6.088 72.205,6.302 M605.1@72.805,6.302 ; C206.2@51.993,27.911 51.627,28.277 51.993,28.643 51.993,28.716 52.577,29.3 U202.32@52.577,30.597 ; U203.8@78.477,5.552 78.501,5.576 80.076,5.576 v1(80.1,5.6)
  Bottom Layer w0.18: v1(80.1,5.6) 80.5,6 80.5,10.6 v1(80.1,11)
  other v1: 74.05,7.05 74.8,8.55 76.3,8.55 72.55,10.05 74.05,10.05 75.55,10.05 77.05,10.05 78.55,10.05 71.8,11.55 73.3,11.55 74.8,11.55 76.3,11.55 77.8,11.55 79.3,11.55
NetC208_1: C208.1 U202.7 | length 2.2
  Top Layer w0.18: U202.7@57.057,35.077 57.837,35.077 58.334,35.574 58.334,35.684 58.75,36.1 C208.1@58.773,36.1
NetC209_1: C209.1 U202.6 | length 1.7
  Top Layer w0.18: U202.6@57.057,34.577 58.669,34.577 C209.1@58.746,34.5
NetC210_2: C210.2 R203.2 U103.16 | length 44.3
  Top Layer w0.127: U103.16@45.003,16.177 45.015,16.164 45.88,16.164 v1(45.923,16.121)
  Top Layer w0.18: v1(49.895,13.305) 49.9,13.3 49.9,11.8 v1(52,9.7) ; v1(79.4,2.9) 79.4,3.675 R203.2@79.502,3.777 C210.2@81.577,3.777
  Bottom Layer w0.18: v1(45.923,16.121) 45.941,16.103 47.097,16.103 47.628,15.572 47.986,15.572 48.794,14.765 48.794,14.406 v1(49.895,13.305) ; v1(52,9.7) 52,9.1 53.3,7.8 54.9,7.8 59.8,2.9 v1(79.4,2.9)
NetC306_1: C306.1 U202.29 | length 3.6
  Top Layer w0.18: C306.1@47.777,29.302 48.077,29.302 48.462,29.687 48.462,30.196 49.843,31.577 U202.29@50.097,31.577
NetC306_2: C306.2 U202.28 | length 2.5
  Top Layer w0.18: C306.2@47.777,31.652 48.939,31.652 49.364,32.077 U202.28@50.097,32.077
NetC317_2: C317.2 R301.2 R302.1 U103.22 | length 16.7
  Top Layer w0.127: U103.22@45.003,18.577 46.406,18.577 v1(46.742,18.912)
  Top Layer w0.18: R301.2@48.777,9.127 R302.1@47.277,9.127 47.302,9.152 C317.2@47.302,10.577 47.302,10.627 49.295,12.62 49.295,13.509 49.515,13.73 49.515,15.215 v1(50.2,15.9)
  Bottom Layer w0.18: v1(46.742,18.912) 48.188,18.912 50.2,16.9 v1(50.2,15.9)
NetC319_2: C319.2 R303.2 R304.1 U103.20 | length 6.4
  Top Layer w0.18: U103.20@45.003,17.777 47.039,17.777 47.043,17.773 47.107,17.773 47.115,17.764 48.502,17.764 ; R304.1@48.502,17.052 48.502,17.764 ; C319.2@48.502,18.577 48.502,17.764 ; R304.1@48.577,16.977 48.502,16.902 48.502,15.948 R303.2@48.7,15.75
NetC320_2: C320.2 R308.1 R309.2 U103.21 | length 34.3
  Top Layer w0.127: U103.21@45.003,18.177 47.023,18.177 47.19,18.343 v1(47.277,18.343)
  Top Layer w0.18: v1(51.8,16.3) 52.6,15.5 53.3,14.8 58,14.8 58.248,14.552 58.248,6.771 62.257,2.762 63.437,2.762 64.152,3.477 C320.2@64.152,3.527 64.227,3.602 64.227,4.777 R309.2@64.25,4.8 ; C320.2@64.227,3.527 R308.1@65.677,3.527
  Bottom Layer w0.18: v1(47.277,18.343) 48.646,16.974 48.646,16.649 49.964,15.331 50.831,15.331 v1(51.8,16.3)
NetC501_2: C501.2 U501.8 Y501.1 | length 8.6
  Top Layer w0.18: Y501.1@20.85,28.4 21.2,28.4 22.15,29.35 23.824,29.35 C501.2@23.95,29.476 23.95,29.5 24.339,29.889 24.363,29.889 25.224,30.75 25.45,30.75 26.45,31.75 U501.8@26.45,33.35
NetC502_1: C502.1 U501.9 Y501.2 | length 6.6
  Top Layer w0.18: Y501.2@20.85,32.7 21.2,32.7 22.276,31.624 C502.1@23.85,31.624 24.907,31.624 25.8,32.517 U501.9@25.8,33.35
NetC503_1: C503.1 U503.17 Y502.1 | length 3.6
  Top Layer w0.127: U503.17@26.927,19.127 27.138,19.339 27.736,19.339 27.875,19.477 28.573,19.477 Y502.1@28.6,19.45 28.627,19.477 28.627,21.053 C503.1@28.724,21.15
NetC504_1: C504.1 U503.16 Y502.3 | length 5.6
  Top Layer w0.127: U503.16@26.927,18.327 29.377,18.327 29.547,18.157 29.547,18.103 30.3,17.35 Y502.3@30.3,17.25 30.327,17.223 30.327,15.801 C504.1@30.176,15.65
NetC505_2: C505.2 U503.6 | length 3.4
  Top Layer w0.18: C505.2@19.177,11.15 19.543,11.516 19.951,11.516 21.042,12.607 21.042,13.242 U503.6@21.227,13.427
NetD301_2: D301.2 R305.1 | length 1.2
  Top Layer w0.18: D301.2@7.25,23.6 R305.1@8.475,23.6
NetD302_2: D302.2 R306.1 | length 1.2
  Top Layer w0.18: D302.2@7.25,22 R306.1@8.475,22
NetD401_4: D401.4 J401.3 R502.1 | length 12.2
  Top Layer w0.18: J401.3@4.175,11.3 7.288,11.3 7.388,11.2 9.395,11.2 9.635,11.441 9.635,11.885 D401.4@9.85,12.1 ; D401.4@9.85,12.354 D401.4@9.85,12.1 ; R502.1@14.299,9.7 14.275,9.7 13.22,10.755 11.4,10.755 10.524,11.631 10.065,11.631 9.85,11.846 D401.4@9.85,12.1
NetD401_6: D401.6 J401.2 R503.1 | length 12.3
  Top Layer w0.18: 3.43,12.06 4.065,12.06 J401.2@4.175,11.95 7.8,11.95 D401.6@7.95,12.1 7.95,12.354 8.305,12.709 8.305,12.779 8.526,13 12.375,13 14.275,11.1 R503.1@14.299,11.1
NetD501_2: D501.2 R505.1 | length 1.2
  Top Layer w0.18: D501.2@7.25,25.2 R505.1@8.475,25.2
NetD502_2: D502.2 R506.1 | length 1.2
  Top Layer w0.18: D502.2@7.25,26.8 R506.1@8.475,26.8
NetDS501_1: DS501.1 R507.1 | length 1.2
  Top Layer w0.18: DS501.1@7.25,20.5 R507.1@8.475,20.5
NetDS502_1: DS502.1 R508.1 | length 1.2
  Top Layer w0.18: DS502.1@7.25,19 R508.1@8.475,19
NetDS503_1: DS503.1 R509.1 | length 1.2
  Top Layer w0.18: DS503.1@7.25,17.5 R509.1@8.475,17.5
NetDS504_1: DS504.1 R510.1 | length 1.2
  Top Layer w0.18: DS504.1@7.25,16 R510.1@8.475,16
NetFB401_2: FB401.2 J401.1 | length 4.1
  Top Layer w0.18: J401.1@4.175,12.6 4.65,12.6 5.85,13.8 FB401.2@7.775,13.8
NetJ402_2: J402.2 U502.6 | length 5.7
  Top Layer w0.18: J402.2@6.1,37.3 9.185,40.385 U502.6@10.55,40.385
NetJ402_3: J402.3 U502.7 | length 6.6
  Top Layer w0.18: J402.3@6.1,34.8 6.1,34.925 9.61,38.435 10.34,38.435 10.45,38.545 10.45,39.015 U502.7@10.55,39.115
NetJ403_2: J403.2 R105.1 R110.1 | length 5.9
  Top Layer w0.18: R105.1@35.277,41.127 35.277,41.772 35.382,41.877 36.6,41.877 ; J403.2@36.6,44.9 36.6,41.877 ; R110.1@36.777,41.077 36.6,41.254 36.6,41.877
NetJ403_3: J403.3 R103.1 R108.1 | length 6.2
  Top Layer w0.18: R103.1@38.277,41.127 38.277,41.797 38.382,41.902 39.677,41.902 ; J403.3@39.1,44.9 39.1,44.558 39.677,43.981 39.677,41.902 ; R108.1@39.777,41.102 39.677,41.202 39.677,41.902
NetJ403_4: J403.4 R101.1 R107.1 | length 5.5
  Top Layer w0.18: R101.1@41.277,41.127 41.562,41.412 41.562,41.902 ; J403.4@41.6,44.9 41.562,44.862 41.562,41.902 ; R107.1@42.777,41.102 42.702,41.102 41.902,41.902 41.562,41.902
NetJ404_2: J404.2 R102.1 R109.2 | length 5.4
  Top Layer w0.18: R102.1@20.377,41.177 R109.2@21.877,41.177 22.241,41.541 22.241,42.513 22.241,44.759 J404.2@22.1,44.9
NetJ404_3: J404.3 R106.1 R112.2 | length 5.3
  Top Layer w0.18: R106.1@23.377,41.177 R112.2@24.877,41.177 24.7,41.354 24.7,44.8 J404.3@24.6,44.9
NetJ404_4: J404.4 R104.1 R111.2 | length 5.5
  Top Layer w0.18: R104.1@26.377,41.177 R111.2@27.877,41.177 27.2,41.854 27.2,44.8 J404.4@27.1,44.9
NetJ405_2: J405.2 P404.3 U103.7 U202.11 U501.14 U503.9 | length 115.4
  Top Layer w0.127: U202.11@56.077,37.557 56.077,37.828 56.121,37.872 56.121,38.106 56.305,38.29 v1(56.305,38.377)
  Top Layer w0.18: U503.9@23.627,13.427 23.627,11.023 23.233,10.629 23.233,8.527 P404.3@24.2,7.56 ; U501.14@27.1,27.55 27.1,29.027 27.2,29.127 v1(27.2,29.2) ; U103.7@41.577,15.151 41.577,14.115 41.514,14.052 41.514,12.306 41.72,12.1 v1(42.363,12.1)
  Bottom Layer w0.127: v1(42.363,12.1) 42.786,11.677 49.656,11.677 50.288,12.309 50.308,12.309 50.891,12.892 50.891,12.912 56.973,18.994 56.973,36.927 56.305,37.595 v1(56.305,38.377)
  Bottom Layer w0.18: J405.2@14.5,3 16,1.5 17.8,1.5 18.2,1.9 18.2,3.6 19.887,5.287 21.927,5.287 P404.3@24.2,7.56 ; v1(27.2,29.2) 27.2,24.403 24.871,22.074 24.871,19.038 26.296,17.613 26.296,12.236 24.968,12.236 24.416,11.684 21.584,11.684 20.475,10.575 20.475,10.425 20.5,10.4 20.5,9.005 20.978,8.527 23.233,8.527 P404.3@24.2,7.56 ; v1(42.363,12.1) 41.72,12.1 41.35,12.47 34.67,12.47 30.726,8.527 25.167,8.527 P404.3@24.2,7.56
NetJ405_3: J405.3 U503.26 | length 24.2
  Top Layer w0.18: v1(22.8,23.6) 22.8,24.8 U503.26@22.827,24.827
  Bottom Layer w0.18: J405.3@17,3 17,9.395 22.8,15.195 v1(22.8,23.6)
NetJ405_4: J405.4 P404.4 U103.8 U202.12 U501.16 U503.10 | length 105.9
  Top Layer w0.127: U202.12@55.577,37.557 55.621,37.601 55.621,38.105 55.762,38.246 55.762,38.698 55.698,38.761 55.698,39.155 v1(55.677,39.177)
  Top Layer w0.18: P404.4@24.2,10.1 24.242,10.142 24.242,13.242 U503.10@24.427,13.427 U503.10@24.612,13.242 ; v1(28.1,29.2) 28.1,29.127 28.4,28.827 U501.16@28.4,27.55 ; v1(29.4,7.1) v1(29.4,9.133) ; U103.8@41.977,15.151 41.977,14.119 41.794,13.936 41.794,13.25 v1@42.144,12.901
  Bottom Layer w0.127: v1(42.144,12.9) 42.231,12.9 42.473,12.658 43.196,12.658 43.524,12.33 49.988,12.33 50.193,12.536 50.214,12.536 50.664,12.986 50.664,13.006 56.746,19.088 56.746,36.754 55.762,37.738 55.762,38.695 55.696,38.761 55.696,39.158 v1(55.677,39.177)
  Bottom Layer w0.18: J405.4@19.5,3 19.7,3 21.1,1.6 23,1.6 23.2,1.8 23.2,3.9 24.02,4.72 27.02,4.72 v1(29.4,7.1) ; v1(28.1,29.2) 28.1,24.907 25.151,21.958 25.151,19.154 26.576,17.729 26.576,12.12 24.556,10.1 P404.4@24.2,10.1 25.167,9.133 v1(29.4,9.133) 30.936,9.133 34.703,12.9 v1(42.144,12.9)
NetJ405_5: J405.5 P404.1 U103.9 U202.13 U501.17 U503.11 | length 99.1
  Top Layer w0.127: U202.13@55.077,37.557 55.077,38.241 55.22,38.383 v1(55.22,38.471)
  Top Layer w0.18: P404.1@21.66,7.56 23.225,5.995 ; J405.5@22,3 22,4.769 23.225,5.995 ; U503.11@25.227,13.427 25.227,12.952 25.412,12.767 26.033,12.767 28.05,10.75 ; v1(29,11.2) 28.55,10.75 28.05,10.75 ; U501.17@29.05,27.55 29.075,27.575 v1(29.075,29.175) ; v1(42.363,13.7) 42.375,13.712 42.375,15.149 U103.9@42.377,15.151 ; 23.225,5.995 27.295,5.995 28.4,7.1 28.4,10.4 28.05,10.75
  Bottom Layer w0.127: v1(42.363,13.7) 43.178,12.885 43.348,12.885 43.675,12.557 47.732,12.557 47.932,12.757 50.114,12.757 50.437,13.08 50.437,13.1 56.519,19.182 56.519,36.66 55.22,37.959 v1(55.22,38.471)
  Bottom Layer w0.18: v1(29,11.2) 31,11.2 33.431,13.631 ; v1(29.075,29.175) 29.075,27.268 29.031,27.224 29.031,25.736 28.38,25.085 28.38,24.791 25.431,21.842 25.431,19.27 29.075,15.626 29.075,14.05 29.494,13.631 33.431,13.631 ; v1(42.363,13.7) 40.327,13.7 39.927,13.3 34.6,13.3 34.269,13.631 33.431,13.631
NetM601_4: M601.4 R601.2 | length 10.2
  Top Layer w0.18: R601.2@63.277,24.277 64.214,24.277 65.005,25.068 71.849,25.068 72.665,24.252 M601.4@72.805,24.252
NetM602_4: M602.4 R602.2 | length 6.5
  Top Layer w0.127: M602.4@69.179,26.302 M602.4@69.249,26.302
  Top Layer w0.18: R602.2@63.278,26.027 64.464,26.027 65.005,25.486 68.293,25.486 69.109,26.302 M602.4@69.179,26.302
NetM603_4: M603.4 R604.2 | length 10
  Top Layer w0.127: M603.4@72.665,16.252 M603.4@72.805,16.252
  Top Layer w0.18: R604.2@63.428,16.327 63.628,16.527 64.464,16.527 65.005,17.068 71.849,17.068 M603.4@72.665,16.252
NetM604_4: M604.4 R605.2 | length 6.7
  Top Layer w0.18: R605.2@63.428,18.077 63.628,18.277 64.214,18.277 65.005,17.486 68.293,17.486 68.786,17.486 69.009,17.709 69.009,18.201 M604.4@69.109,18.302
NetM605_4: M605.4 R606.2 | length 10.2
  Top Layer w0.18: R606.2@63.278,8.277 63.278,8.28 63.666,8.668 64.166,8.668 64.566,9.068 71.849,9.068 72.665,8.252 M605.4@72.805,8.252
NetM606_4: M606.4 R607.2 | length 6.5
  Top Layer w0.18: R607.2@63.278,10.027 63.278,10.024 63.666,9.636 64.169,9.636 64.319,9.486 68.293,9.486 69.109,10.302 M606.4@69.249,10.302